# Altium PCB VoiceAssistant-v1.0.PcbDoc (part 3 of 3)
Units mm, origin at the board's own origin, x right, y up, seen from the top; angles counter-clockwise.
Board outline 90 x 90 mm, 2 copper layers (Top Layer, Bottom Layer); 340 components, 253 nets, 950 pads, 0 vias.
Unrouted connection lines stored in the file: 677.
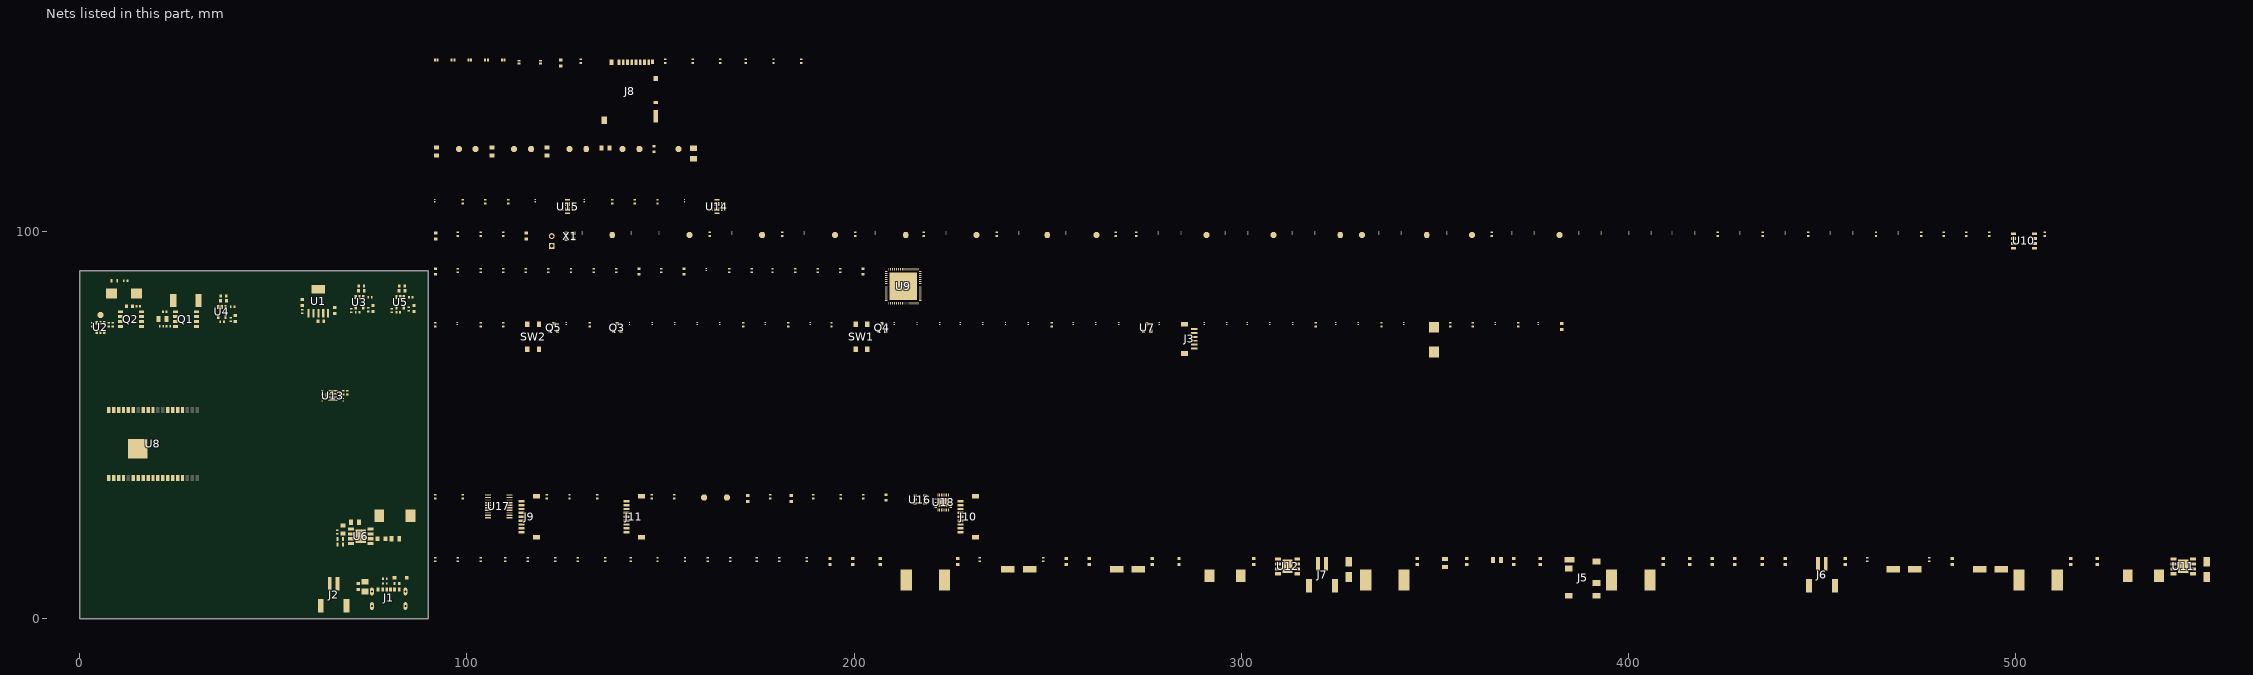
[diagram p2: the nets of this part, all layers, seen from the top]

## Part data (continued)
R22: library part RC0603FR-071ML, "RES SMD 1M OHM 1% 1/10W 0603", Case Code (Imperial)=0603, Case Code (Metric)=1608, LCSC Part Number=C105578, Manufacturer=Yageo, Max Operating Temperature=155°C, Min Operating Temperature=-55°C, Package Quantity=5000, Power Rating=100mW, Resistance=1MR, Supplier Part Number 1=311-1.00MHRDKR-ND, Temperature Coefficient=100ppm/°C, Tolerance=1%, Voltage Rating=50V, Case/Package=0603, ComponentLink1Description=http://www.farnell.com/datasheets/2167052.pdf?src-supplier=Mouser, ComponentLink1URL=http://www.farnell.com/datasheets/2167052.pdf?src-supplier=Mouser, ComponentLink2Description=http://www.farnell.com/datasheets/2167052.pdf?src-supplier=Element14, ComponentLink2URL=http://www.farnell.com/datasheets/2167052.pdf?src-supplier=Element14, ComponentLink3Description=http://documents.rs-components.com/techlib://itc_doclist_GB.htm?stockno=5048956&src-supplier=RSComponents, ComponentLink3URL=http://documents.rs-components.com/techlib://itc_doclist_GB.htm?stockno=5048956&src-supplier=RSComponents, Composition="Thick Film", Depth=0.8mm, Height=0.45mm, Item Type=Resistor, Lead Free="Lead Free", Length=1.6mm, Manufacturer Part Number=RC0603FR-071ML, Military Standard=Not, Number of Pins=2, Packaging="Tape and Reel", Pricing 1="1=0.1, 10=0.023, 100=0.0094, 1000=0.00421, 2500=0.00366 (USD)", REACH SVHC="No SVHC", Stock 1=3824601, Supplier 1=Digi-Key, Termination=SMD/SMT, Voltage Rating (DC)=50V, Width=0.8mm
R24: library part RT0805BRD07316RL, "RES SMD 316 OHM 0.1% 1/8W 0805", Case Code (Imperial)=0805, Case Code (Metric)=2012, LCSC Part Number=C723489, Manufacturer=Yageo, Max Operating Temperature=155°C, Max Power Dissipation=125mW, Min Operating Temperature=-55°C, Supplier Part Number=RT0805BRD07316RL-ND, Temperature Coefficient=25ppm/°C, Tolerance=0.1%, Voltage Rating=150V, Case/Package=0805, Category="Chip SMD Resistors", ComponentLink1Description=https://datasheet.ciiva.com/2584/pyu-rt-1-to-0-05-rohs-l-5-2584943.pdf?src-supplier=Digi-Key, ComponentLink1URL=https://datasheet.ciiva.com/2584/pyu-rt-1-to-0-05-rohs-l-5-2584943.pdf?src-supplier=Digi-Key, Height=0.5mm, Item Type=Resistor, Lead Free="Lead Free", Length=2mm, Manufacturer Part Number=RT0805BRD07316RL, Number of Terminations=2, Packaging="Tape and Reel", Power Rating=125mW, Pricing="5000=0.04319 (USD)", RoHS=Yes, RoHS Compliant=Yes, Series=RT, Supplier=Digi-Key, Termination=SMD/SMT, Voltage Rating (DC)=150V, Weight=0.000194oz, Width=1.2mm
R25: library part RC0805FR-071KL, "RES 1K OHM 1% 1/8W 0805", Case Code (Imperial)=0805, Case Code (Metric)=2012, LCSC Part Number=C95781, Manufacturer=Yageo, Max Operating Temperature=155°C, Max Power Dissipation=125mW, Min Operating Temperature=-55°C, Package Quantity=1, Resistance Tolerance=1%, Resistor Type="Thick Film", Supplier Part Number=8126013, Temperature Coefficient=100ppm/°C, Voltage Rating=150V, Case/Package=0805, Category="Chip SMD Resistors", ComponentLink1Description=https://datasheet.ciiva.com/7941/1686128-7941719.pdf?src-supplier=Element14, ComponentLink1URL=https://datasheet.ciiva.com/7941/1686128-7941719.pdf?src-supplier=Element14, ComponentLink2Description=https://datasheet.ciiva.com/46385/444164-46385020.pdf?src-supplier=Element14, ComponentLink2URL=https://datasheet.ciiva.com/46385/444164-46385020.pdf?src-supplier=Element14, ComponentLink3Description=https://datasheet.ciiva.com/2456/pyu-r-int-thick-7-2456976.pdf?src-supplier=Digi-Key, ComponentLink3URL=https://datasheet.ciiva.com/2456/pyu-r-int-thick-7-2456976.pdf?src-supplier=Digi-Key, ComponentLink4Description=https://datasheet.ciiva.com/2456/pyu-r-int-thick-7-2456977.pdf?src-supplier=Digi-Key, ComponentLink4URL=https://datasheet.ciiva.com/2456/pyu-r-int-thick-7-2456977.pdf?src-supplier=Digi-Key, ComponentLink5Description=https://datasheet.ciiva.com/2456/pyu-r-int-thick-7-2456975.pdf?src-supplier=Digi-Key, ComponentLink5URL=https://datasheet.ciiva.com/2456/pyu-r-int-thick-7-2456975.pdf?src-supplier=Digi-Key, ComponentLink6Description=https://datasheet.ciiva.com/16850/rc0805-16850409.pdf?src-supplier=Future+Electronics, ComponentLink6URL=https://datasheet.ciiva.com/16850/rc0805-16850409.pdf?src-supplier=Future+Electronics, Construction=Rectangular, Depth=1.25mm, Features="Moisture Resistant", Height=0.024inch, Item Type=Resistor, Lead Free=5697LeadFree, Length=0.079inch, Manufacturer Part Number=RC0805FR-071KL, Military Standard=Not, Number of Terminations=2, Packaging="Tape and Reel", Pins=2, Power Rating=125mW, Pricing="5000=0.117, 25000=0.112, 125000=0.107, 500000=0.104, 1250000=0.0981 (USD)", Reach SVHC Compliant=No, RoHS=Yes, RoHS Compliant=Yes, Series=RC, Stock=8305000, Supplier="Future Electronics", Termination=SMD/SMT, Tolerance=1%, Voltage Rating (AC)=150V, Voltage Rating (DC)=150V, Width=0.049inch
R30 R32 R33 R34 R37 R41 R42 R43 R44 R45 R46 R47 R48 R49 R50 R51 R52 R53 R54 R55 R56 R57 R58 R59 R60 R61 R62 R63 R64 R65 R67: library part RC0201JR-070RL, "RES SMD 0 OHM JUMPER 1/20W 0201", Case Code (Imperial)=0201, Case Code (Metric)=0603, LCSC Part Number=C106228, Manufacturer=Yageo, Max Operating Temperature=125°C, Max Power Dissipation=50mW, Min Operating Temperature=-55°C, Package Quantity=10000, Resistance Tolerance=5%, Resistor Type="Thick Film", Supplier Part Number 1=311-0.0NCT-ND, Voltage Rating=25V, Case/Package=0201, Category="Chip SMD Resistors", ComponentLink1Description=https://datasheet.ciiva.com/7672/1563626-7672247.pdf?src-supplier=Element14, ComponentLink1URL=https://datasheet.ciiva.com/7672/1563626-7672247.pdf?src-supplier=Element14, ComponentLink2Description=https://datasheet.ciiva.com/7660/1421516-7660808.pdf?src-supplier=Element14, ComponentLink2URL=https://datasheet.ciiva.com/7660/1421516-7660808.pdf?src-supplier=Element14, ComponentLink3Description=https://datasheet.ciiva.com/7672/1563626-7672248.pdf?src-supplier=Element14, ComponentLink3URL=https://datasheet.ciiva.com/7672/1563626-7672248.pdf?src-supplier=Element14, ComponentLink4Description=https://datasheet.ciiva.com/16855/pyu-rc0201-51-rohs-l-8-16855994.pdf?src-supplier=Avnet+Europe, ComponentLink4URL=https://datasheet.ciiva.com/16855/pyu-rc0201-51-rohs-l-8-16855994.pdf?src-supplier=Avnet+Europe, ComponentLink5Description=https://datasheet.ciiva.com/28419/pyu-rc0201-51-rohs-l-8-28419660.pdf?src-supplier=Avnet+Europe, ComponentLink5URL=https://datasheet.ciiva.com/28419/pyu-rc0201-51-rohs-l-8-28419660.pdf?src-supplier=Avnet+Europe, ComponentLink6Description=https://datasheet.ciiva.com/46391/1421516-46391340.pdf?src-supplier=Element14, ComponentLink6URL=https://datasheet.ciiva.com/46391/1421516-46391340.pdf?src-supplier=Element14, ComponentLink7Description=https://datasheet.ciiva.com/8896/pyu-rc0201-51-rohs-l-8-8896143.pdf?src-supplier=Avnet, ComponentLink7URL=https://datasheet.ciiva.com/8896/pyu-rc0201-51-rohs-l-8-8896143.pdf?src-supplier=Avnet, Construction=Rectangular, Contact Plating=Tin,Matte, Depth=0.3mm, Features="Moisture Resistant", Height=0.01inch, Lead Free="Lead Free", Length=0.6mm, Manufacturer Part Number=RC0201JR-070RL, Military Standard=Not, Number of Terminations=2, Packaging="Tape and Reel", Power Rating=50mW, Pricing 1="1=0.10000, 10=0.03600, 25=0.02640, 50=0.02000, 100=0.01480, 250=0.01128, 500=0.00904, 1000=0.00665, 5000=0.00477 (USD)", Radiation Hardening=No, REACH SVHC=Unknown, Resistance=0R, RoHS=Yes, RoHS Compliant=Yes, Series=RC, Size Code=0201, Stock 1=11079, Supplier 1=Digi-Key, Termination=SMD/SMT, Tolerance=5%, Voltage Rating (DC)=25V, Weight=6E-06oz, Width=0.012inch
R35 R112 R113 R114 R116: library part RC0603JR-070RL, "RES 0 OHM JUMPER 1/10W 0603", Case Code (Imperial)=0603, Case Code (Metric)=1608, LCSC Part Number=C95177, Manufacturer=Yageo, Max Operating Temperature=155°C, Max Power Dissipation=100mW, Min Operating Temperature=-55°C, Package Quantity=5000, Resistance=0mR, Resistance Tolerance=5%, Resistor Type="Thick Film", Supplier Part Number 1=311-0.0GRCT-ND, Temperature Coefficient=200ppm/°C, Tolerance=1%, Voltage Rating=50V, Case/Package=0603, Category="Chip SMD Resistors", Construction=Rectangular, Contact Plating=Tin,Matte, Depth=0.8mm, Features="Moisture Resistant", Height=0.45mm, Item Type=Resistor, Lead Free="Lead Free", Length=1.6mm, Manufacturer Part Number=RC0603JR-070RL, Military Standard=Not, Number of Pins=2, Number of Terminations=2, Packaging="Tape and Reel", Power Rating=100mW, Pricing 1="1=0.10000, 10=0.01700, 25=0.01240, 50=0.00960, 100=0.00700, 250=0.00536, 500=0.00430, 1000=0.00316 (USD)", Radiation Hardening=No, Reach SVHC Compliant="No SVHC", RoHS=Yes, RoHS Compliant=Yes, Series=RC, Size Code=0603, Stock 1=18081776, Supplier 1=Digi-Key, Technology="THICK FILM", Termination=SMD/SMT, Voltage Rating (DC)=50V, Width=0.8mm
R75 R76 R77 R78 R79 R80 R81 R82 R83 R84 R85 R86 R87 R88 R93 R94 R95 R96 R97 R98 R99 R100 R101 R102 R103 R104 R105 R106 R107 R108 R136 R138 R140 R141 R142 R143: library part RC0201FR-0733RL, "RES 33 OHM 1% 1/20W 0201", LCSC Part Number=C295794, Manufacturer=Yageo, Supplier Part Number=6199285, Category="Chip SMD Resistors", ComponentLink1Description=https://datasheet.ciiva.com/2560/pyu-r-int-thick-7-2560877.pdf?src-supplier=Digi-Key, ComponentLink1URL=https://datasheet.ciiva.com/2560/pyu-r-int-thick-7-2560877.pdf?src-supplier=Digi-Key, ComponentLink2Description=https://datasheet.ciiva.com/2560/pyu-r-int-thick-7-2560878.pdf?src-supplier=Digi-Key, ComponentLink2URL=https://datasheet.ciiva.com/2560/pyu-r-int-thick-7-2560878.pdf?src-supplier=Digi-Key, ComponentLink3Description=https://datasheet.ciiva.com/2560/pyu-r-int-thick-7-2560879.pdf?src-supplier=Digi-Key, ComponentLink3URL=https://datasheet.ciiva.com/2560/pyu-r-int-thick-7-2560879.pdf?src-supplier=Digi-Key, ComponentLink4Description=https://datasheet.ciiva.com/7672/1563626-7672223.pdf?src-supplier=Element14, ComponentLink4URL=https://datasheet.ciiva.com/7672/1563626-7672223.pdf?src-supplier=Element14, ComponentLink5Description=https://datasheet.ciiva.com/22698/1563626-22698520.pdf?src-supplier=Element14, ComponentLink5URL=https://datasheet.ciiva.com/22698/1563626-22698520.pdf?src-supplier=Element14, Item Type=Resistor, Manufacturer Part Number=RC0201FR-0733RL, Pricing="10000=0.0013, 50000=0.0012, 250000=0.0012, 750000=0.0011, 2000000=0.001 (USD)", RoHS=Yes, Stock=1420000, Supplier="Future Electronics"
R109: library part RC0201FR-073K3L, "RES 3.3K OHM 1% 1/20W 0201", LCSC Part Number=C274874, Manufacturer=Yageo, Supplier Part Number=1068525, Category="Chip SMD Resistors", ComponentLink1Description=https://datasheet.ciiva.com/14985/pyu-r-int-thick-7-14985418.pdf?src-supplier=Digi-Key, ComponentLink1URL=https://datasheet.ciiva.com/14985/pyu-r-int-thick-7-14985418.pdf?src-supplier=Digi-Key, ComponentLink2Description=https://datasheet.ciiva.com/22698/1563626-22698524.pdf?src-supplier=Element14, ComponentLink2URL=https://datasheet.ciiva.com/22698/1563626-22698524.pdf?src-supplier=Element14, Item Type=Resistor, Manufacturer Part Number=RC0201FR-073K3L, Pricing="10000=0.0009, 50000=0.0013, 100000=0.0008, 250000=0.0013, 400000=0.0008, 750000=0.0012, 1500000=0.0007, 2000000=0.0011, 5000000=0.0007 (USD)", RoHS=Yes, Stock=40000, Supplier="Future Electronics"
R110 R111: library part RC0402FR-0756KL, "RES 56K OHM 1% 1/16W 0402", Case Code (Imperial)=0402, Case Code (Metric)=1005, LCSC Part Number=C114756, Manufacturer=Yageo, Max Operating Temperature=155°C, Max Power Dissipation=63mW, Min Operating Temperature=-55°C, Package Quantity=1, Power Rating=62.5mW, Resistance Tolerance=1%, Resistor Type="Thick Film", Supplier Part Number 1=3873767, Temperature Coefficient=100ppm/°C, Voltage Rating=50V, Case/Package=0402, Category="Chip SMD Resistors", ComponentLink1Description=https://datasheet.ciiva.com/46412/1018594-46412840.pdf?src-supplier=Element14, ComponentLink1URL=https://datasheet.ciiva.com/46412/1018594-46412840.pdf?src-supplier=Element14, ComponentLink2Description=https://datasheet.ciiva.com/2453/pyu-r-int-thick-7-2453479.pdf?src-supplier=Digi-Key, ComponentLink2URL=https://datasheet.ciiva.com/2453/pyu-r-int-thick-7-2453479.pdf?src-supplier=Digi-Key, ComponentLink3Description=https://datasheet.ciiva.com/2453/pyu-r-int-thick-7-2453480.pdf?src-supplier=Digi-Key, ComponentLink3URL=https://datasheet.ciiva.com/2453/pyu-r-int-thick-7-2453480.pdf?src-supplier=Digi-Key, ComponentLink4Description=https://datasheet.ciiva.com/2453/pyu-r-int-thick-7-2453478.pdf?src-supplier=Digi-Key, ComponentLink4URL=https://datasheet.ciiva.com/2453/pyu-r-int-thick-7-2453478.pdf?src-supplier=Digi-Key, ComponentLink5Description=https://datasheet.ciiva.com/5558/pyu-rc0402-51-rohs-l-6-r-5558279.pdf?src-supplier=Mouser, ComponentLink5URL=https://datasheet.ciiva.com/5558/pyu-rc0402-51-rohs-l-6-r-5558279.pdf?src-supplier=Mouser, ComponentLink6Description=https://datasheet.ciiva.com/7850/1018594-7850045.pdf?src-supplier=Element14, ComponentLink6URL=https://datasheet.ciiva.com/7850/1018594-7850045.pdf?src-supplier=Element14, ComponentLink7Description=https://datasheet.ciiva.com/7850/1018594-7850044.pdf?src-supplier=Element14, ComponentLink7URL=https://datasheet.ciiva.com/7850/1018594-7850044.pdf?src-supplier=Element14, Construction=Rectangular, Depth=0.5mm, Features="Moisture Resistant", Height=0.016inch, Item Type=Resistor, Lead Free="Lead Free", Length=0.039inch, Manufacturer Part Number=RC0402FR-0756KL, Military Standard=Not, Number of Terminations=2, Packaging="Tape and Reel", Pricing 1="10000=0.001, 50000=0.001, 300000=0.0009, 1000000=0.0009, 3000000=0.0008 (USD)", Reach SVHC Compliant=No, RoHS=Yes, RoHS Compliant=Yes, Series=RC, Stock 1=2610000, Supplier 1="Future Electronics", Technology="THICK FILM", Termination=SMD/SMT, Tolerance=1%, Width=0.02inch, Working Voltage=50V
R115: library part RC0603FR-0722K1L, "RES 22.1K OHM 1% 1/10W 0603", Case Code (Imperial)=0603, Case Code (Metric)=1608, LCSC Part Number=C137768, Manufacturer=Yageo, Max Operating Temperature=155°C, Min Operating Temperature=-55°C, Package Quantity=5000, Power Rating=100mW, Resistance=22.1kR, Temperature Coefficient=100ppm/°C, Tolerance=1%, Voltage Rating=50V, Case/Package=0603, Category="Chip SMD Resistors", ComponentLink1Description=https://datasheet.ciiva.com/12555/rc0603-272842-12555287.pdf?src-supplier=Mouser, ComponentLink1URL=https://datasheet.ciiva.com/12555/rc0603-272842-12555287.pdf?src-supplier=Mouser, Height=0.45mm, Item Type=Resistor, Lead Free="Lead Free", Length=1.6mm, Manufacturer Part Number=RC0603FR-0722K1L, Packaging="Tape and Reel", Pricing 1="5000=0.00133, 10000=0.00131, 20000=0.00127 (USD)", RoHS=Yes, RoHS Compliant=Yes, Series=RC, Size Code=0603, Stock 1=595000, Supplier 1=Avnet, Supplier Part Number 1=RC0603FR-0722K1L, Termination=SMD/SMT, Voltage Rating (DC)=50V, Width=0.8mm
R118 R119: library part RC0603FR-071RL, "RES 1 OHM 1% 1/10W 0603", Case Code (Imperial)=0603, Case Code (Metric)=1608, LCSC Part Number=C112305, Manufacturer=Yageo, Max Operating Temperature=155°C, Max Power Dissipation=100mW, Min Operating Temperature=-55°C, Package Quantity=1, Resistance Tolerance=1%, Resistor Type="Thick Film", Supplier Part Number=5226550, Temperature Coefficient=200ppm/°C, Voltage Rating=50V, Case/Package=0603, Category="Chip SMD Resistors", ComponentLink1Description=https://datasheet.ciiva.com/11808/0900766b80f96399-11808162.pdf?src-supplier=Rs, ComponentLink1URL=https://datasheet.ciiva.com/11808/0900766b80f96399-11808162.pdf?src-supplier=Rs, ComponentLink2Description=https://datasheet.ciiva.com/6547/pyu-r-int-thick-7-6547270.pdf?src-supplier=Digi-Key, ComponentLink2URL=https://datasheet.ciiva.com/6547/pyu-r-int-thick-7-6547270.pdf?src-supplier=Digi-Key, ComponentLink3Description=https://datasheet.ciiva.com/6547/pyu-r-int-thick-7-6547271.pdf?src-supplier=Digi-Key, ComponentLink3URL=https://datasheet.ciiva.com/6547/pyu-r-int-thick-7-6547271.pdf?src-supplier=Digi-Key, ComponentLink4Description=https://datasheet.ciiva.com/6547/pyu-r-int-thick-7-6547269.pdf?src-supplier=Digi-Key, ComponentLink4URL=https://datasheet.ciiva.com/6547/pyu-r-int-thick-7-6547269.pdf?src-supplier=Digi-Key, ComponentLink5Description=https://datasheet.ciiva.com/7746/1738695-7746296.pdf?src-supplier=Element14, ComponentLink5URL=https://datasheet.ciiva.com/7746/1738695-7746296.pdf?src-supplier=Element14, ComponentLink6Description=https://datasheet.ciiva.com/7746/1738695-7746297.pdf?src-supplier=Element14, ComponentLink6URL=https://datasheet.ciiva.com/7746/1738695-7746297.pdf?src-supplier=Element14, Depth=0.8mm, Features="Moisture Resistant", Height=0.022inch, Item Type=Resistor, Lead Free="Lead Free", Length=0.063inch, Manufacturer Part Number=RC0603FR-071RL, Number of Terminations=2, Packaging="Tape and Reel", Pins=2, Power Rating=100mW, Pricing="5000=0.0023, 25000=0.0022, 125000=0.0021, 500000=0.002, 1250000=0.0018 (USD)", Reach SVHC Compliant=Unknown, RoHS=Yes, RoHS Compliant=Yes, Series=RC, Stock=4635000, Supplier="Future Electronics", Technology="THICK FILM", Termination=SMD/SMT, Tolerance=1%, Voltage Rating (DC)=50V, Width=0.031inch
R120: library part RT0402BRD0718KL, "RES SMD 18K OHM 0.1% 1/16W 0402", Case Code (Imperial)=0402, Case Code (Metric)=1005, LCSC Part Number=C852579, Manufacturer=Yageo, Max Operating Temperature=155°C, Max Power Dissipation=63mW, Min Operating Temperature=-55°C, Package Quantity=10000, Power Rating=62.5mW, Supplier Part Number=4031418, Temperature Coefficient=25ppm/°C, Tolerance=0.1%, Voltage Rating=50V, Case/Package=0402, Category="Chip SMD Resistors", ComponentLink1Description=https://datasheet.ciiva.com/12798/pyu-rt-1-to-0-05-rohs-l-4-12798951.pdf?src-supplier=Mouser, ComponentLink1URL=https://datasheet.ciiva.com/12798/pyu-rt-1-to-0-05-rohs-l-4-12798951.pdf?src-supplier=Mouser, ComponentLink2Description=https://datasheet.ciiva.com/2582/pyu-rt-1-to-0-05-rohs-l-5-2582178.pdf?src-supplier=Digi-Key, ComponentLink2URL=https://datasheet.ciiva.com/2582/pyu-rt-1-to-0-05-rohs-l-5-2582178.pdf?src-supplier=Digi-Key, Height=0.014inch, Item Type=Resistor, Lead Free="Lead Free", Length=0.039inch, Manufacturer Part Number=RT0402BRD0718KL, Number of Terminations=2, Packaging="Tape and Reel", Pricing="10000=0.02, 20000=0.0196, 40000=0.0191, 50000=0.019, 150000=0.0181 (USD)", RoHS=Yes, RoHS Compliant=Yes, Series=RT, Stock=120000, Supplier="Future Electronics", Termination=SMD/SMT, Voltage Rating (DC)=50V, Weight=2.3E-05oz, Width=0.5mm
R121: library part RT0402BRD0728KL, "RES SMD 28K OHM 0.1% 1/16W 0402", LCSC Part Number=C852686, Manufacturer=Yageo, Supplier Part Number=YAG4224CT-ND, Category="Chip SMD Resistors", ComponentLink1Description=https://datasheet.ciiva.com/2582/pyu-rt-1-to-0-05-rohs-l-5-2582274.pdf?src-supplier=Digi-Key, ComponentLink1URL=https://datasheet.ciiva.com/2582/pyu-rt-1-to-0-05-rohs-l-5-2582274.pdf?src-supplier=Digi-Key, Item Type=Resistor, Manufacturer Part Number=RT0402BRD0728KL, Pricing="1=0.38, 10=0.307, 50=0.1704, 100=0.1198, 500=0.07636, 1000=0.05287, 5000=0.04406 (USD)", RoHS=Yes, Stock=21647, Supplier=Digi-Key
R122 R124: library part RT0603BRD07510KL, "RES SMD 510K OHM 0.1% 1/10W 0603", LCSC Part Number=C861452, Manufacturer=Yageo, Supplier Part Number=13-RT0603BRD07510KLCT-ND, Category="Chip SMD Resistors", ComponentLink1Description=https://datasheet.ciiva.com/12810/pyu-rt-1-to-0-05-rohs-l-4-12810533.pdf?src-supplier=Mouser, ComponentLink1URL=https://datasheet.ciiva.com/12810/pyu-rt-1-to-0-05-rohs-l-4-12810533.pdf?src-supplier=Mouser, Item Type=Resistor, Manufacturer Part Number=RT0603BRD07510KL, Pricing="1=0.3, 10=0.243, 50=0.135, 100=0.095, 500=0.06052, 1000=0.0419 (USD)", RoHS=Yes, Stock=20520, Supplier=Digi-Key
R123 R125: library part RT0603BRE07110KL, "RES SMD 110K OHM 0.1% 1/10W 0603", LCSC Part Number=C861631, Manufacturer=Yageo, Supplier Part Number=603-RT0603BRE07110KL, Category="Chip SMD Resistors", ComponentLink1Description=https://datasheet.ciiva.com/2584/pyu-rt-1-to-0-05-rohs-l-5-2584174.pdf?src-supplier=Digi-Key, ComponentLink1URL=https://datasheet.ciiva.com/2584/pyu-rt-1-to-0-05-rohs-l-5-2584174.pdf?src-supplier=Digi-Key, Item Type=Resistor, Manufacturer Part Number=RT0603BRE07110KL, Pricing="1=0.42, 10=0.191, 50=0.191, 100=0.096, 1000=0.061, 10000=0.038 (USD)", RoHS=Yes, Stock=12188, Supplier=Mouser
R126 R127: library part RC0402FR-0730KL, "RES 30K OHM 1% 1/16W 0402", Case Code (Imperial)=0402, Case Code (Metric)=1005, Manufacturer=Yageo, Max Operating Temperature=155°C, Max Power Dissipation=63mW, Min Operating Temperature=-55°C, Power Rating=62.5mW, Resistance=30kR, Resistance Tolerance=1%, Resistor Type="Thick Film", Supplier Part Number 1=603-RC0402FR-0730KL, Temperature Coefficient=100ppm/°C, Voltage Rating=50V, Case/Package=0402, Category="Chip SMD Resistors", ComponentLink1Description=https://datasheet.ciiva.com/7849/1018594-7849957.pdf?src-supplier=Element14, ComponentLink1URL=https://datasheet.ciiva.com/7849/1018594-7849957.pdf?src-supplier=Element14, ComponentLink2Description=https://datasheet.ciiva.com/46394/1018594-46394938.pdf?src-supplier=Element14, ComponentLink2URL=https://datasheet.ciiva.com/46394/1018594-46394938.pdf?src-supplier=Element14, ComponentLink3Description=https://datasheet.ciiva.com/12577/pyu-rc0402-51-rohs-l-6-r-12577743.pdf?src-supplier=Mouser, ComponentLink3URL=https://datasheet.ciiva.com/12577/pyu-rc0402-51-rohs-l-6-r-12577743.pdf?src-supplier=Mouser, Construction=Rectangular, Depth=0.5mm, Features="Moisture Resistant", Height=0.35mm, Lead Free="Lead Free", Length=1mm, Manufacturer Part Number=RC0402FR-0730KL, Military Standard=Not, Number of Terminations=2, Packaging="Tape and Reel", Pricing 1="1=0.10000, 10=0.01200, 50=0.01200, 100=0.00500, 1000=0.00300, 2500=0.00200, 10000=0.00100 (USD)", REACH SVHC=Unknown, RoHS=Yes, RoHS Compliant=Yes, Series=RC, Size Code=0402, Stock 1=684954, Supplier 1=Mouser, Termination=SMD/SMT, Tolerance=1%, Voltage Rating (DC)=50V, Weight=2.3E-05oz, Width=0.5mm
SB1: "Solder Bridge ON", Item Type="Solder Bridge", Manufacturer Part Number="Solder Bridge 0402"
SW1 SW2: "No NO 50mA 4.5mm 100000 260gf 12V -30℃~+85℃ 4.5mm 4.3mm Black Round Button Brick nogging SPST SMD Tactile Switches ROHS", LCSC Part Number=C381037, Manufacturer="XKB Connectivity", Package=Custom, ComponentLink1Description=LCSC, ComponentLink1URL=https://www.lcsc.com/product-detail/Tactile-Switches_XKB-Connectivity-TS-1109S-C-B_C381037.html, Item Type=Switch, Manufacturer Part Number=TS-1109S-C-B
U1: "IC REG LINEAR 3.3V 1A SOT223-6", LCSC Part Number=C485803, Manufacturer="Texas Instruments", Supplier Part Number=595-TPS79633DCQR, Category="Voltage Regulators - Linear", ComponentLink1Description=https://datasheet.ciiva.com/2045/tps79601-2045264.pdf?src-supplier=Digi-Key, ComponentLink1URL=https://datasheet.ciiva.com/2045/tps79601-2045264.pdf?src-supplier=Digi-Key, ComponentLink2Description=https://datasheet.ciiva.com/22704/1846966-22704703.pdf?src-supplier=Element14, ComponentLink2URL=https://datasheet.ciiva.com/22704/1846966-22704703.pdf?src-supplier=Element14, ComponentLink3Description=https://datasheet.ciiva.com/41462/001015136-da-01-en-ic-reg-ldo-3-3v-1-tps79633dcqr-sot-6-tid-41462982.pdf?src-supplier=Conrad, ComponentLink3URL=https://datasheet.ciiva.com/41462/001015136-da-01-en-ic-reg-ldo-3-3v-1-tps79633dcqr-sot-6-tid-41462982.pdf?src-supplier=Conrad, Item Type=IC, Length=6.5mm, Manufacturer Part Number=TPS79633DCQR, Pricing="1=3.24, 10=2.75, 50=2.75, 100=2.39, 1000=1.72, 10000=1.56 (USD)", RoHS=Yes, Stock=3089, Supplier=Mouser, Thickness=1.6mm, Width=3.5mm
U2: "IC CNTRLR ON/OFF W/DEB TSOT23-6", Case/Package=SOT-23-6, LCSC Part Number=C79401, Manufacturer=Maxim, Max Operating Temperature=125°C, Max Power Dissipation=727W, Max Supply Voltage=5.5V, Min Operating Temperature=-40°C, Min Supply Voltage=2.7V, Number of Voltages Monitored=1, Operating Supply Current=7uA, Undervoltage Threshold=1.8V, Category="Interface ICs", ComponentLink1Description=https://datasheet.ciiva.com/4901/max16054-83881-4901086.pdf?src-supplier=Mouser, ComponentLink1URL=https://datasheet.ciiva.com/4901/max16054-83881-4901086.pdf?src-supplier=Mouser, ComponentLink2Description=https://datasheet.ciiva.com/1784/max16054-1784560.pdf?src-supplier=Digi-Key, ComponentLink2URL=https://datasheet.ciiva.com/1784/max16054-1784560.pdf?src-supplier=Digi-Key, ComponentLink3Description=https://datasheet.ciiva.com/14247/max16054-14247770.pdf?src-supplier=Avnet, ComponentLink3URL=https://datasheet.ciiva.com/14247/max16054-14247770.pdf?src-supplier=Avnet, ComponentLink4Description=https://datasheet.ciiva.com/1784/max16054-1784561.pdf?src-supplier=Digi-Key, ComponentLink4URL=https://datasheet.ciiva.com/1784/max16054-1784561.pdf?src-supplier=Digi-Key, ComponentLink5Description=https://datasheet.ciiva.com/1784/max16054-1784562.pdf?src-supplier=Digi-Key, ComponentLink5URL=https://datasheet.ciiva.com/1784/max16054-1784562.pdf?src-supplier=Digi-Key, Contact Plating=Tin,Matte, Height=0.73mm, Item Type=IC, Length=4mm, Manufacturer Part Number=MAX16054AZT+T, Mounting Technology="Surface Mount", Output Type=PUSH-PULL, Package Quantity=1, Packaging="Tape and Reel", Pins=6, Pricing 1="1=2.99700 (USD)", Radiation Hardening=No, RoHS=Yes, RoHS Compliant=Yes, Series=-, Stock 1=3, Supplier 1="Arrow Electronics", Supplier Part Number 1=MAX16054AZT+T, Watchdog Timer=No, Width=4mm
U3 U4 U5 U16: "IC REG LIN POS ADJ 400MA SOT23-5", LCSC Part Number=C59200, Manufacturer="Texas Instruments", Supplier Part Number=595-TPS73601DBVR, Category="Voltage Regulators - Linear", ComponentLink1Description=https://datasheet.ciiva.com/22700/1831172-22700145.pdf?src-supplier=Element14, ComponentLink1URL=https://datasheet.ciiva.com/22700/1831172-22700145.pdf?src-supplier=Element14, ComponentLink2Description=https://datasheet.ciiva.com/41462/001015018-da-01-en-ic-reg-ldo-adj-0-tps73601dbvr-sot-5-tid-41462863.pdf?src-supplier=Conrad, ComponentLink2URL=https://datasheet.ciiva.com/41462/001015018-da-01-en-ic-reg-ldo-adj-0-tps73601dbvr-sot-5-tid-41462863.pdf?src-supplier=Conrad, Item Type=IC, Manufacturer Part Number=TPS73601DBVR, Pricing="1=1.44, 10=1.25, 50=1.25, 100=0.966, 1000=0.655, 10000=0.621 (USD)", RoHS=Yes, Stock=2988, Supplier=Mouser
U6: "4V~6V Polymer 1 3.5A SOP-8-EP Battery Management ICs ROHS", LCSC Part Number=C130316, Manufacturer=SOLA-IC, Package=SOP-8-EP, ComponentLink1Description=LCSC, ComponentLink1URL=https://www.lcsc.com/product-detail/Battery-Management-ICs_SOLA-IC-SLM6600_C130316.html, Item Type=IC, Manufacturer Part Number=SLM6600
U7: "IC SUPERVISOR 1 CHANNEL SOT23-3", Case/Package=SOT-23, LCSC Part Number=C43445, Manufacturer="ON Semiconductor", Max Operating Temperature=85°C, Max Power Dissipation=320mW, Max Reset Threshold Voltage=2.66V, Max Supply Voltage=5.5V, Min Operating Temperature=-40°C, Min Reset Threshold Voltage=2.59V, Min Supply Voltage=1.2V, Number of Voltages Monitored=1, Operating Supply Current=15uA, Threshold Voltage=2.63V, Category="Voltage Supervisors", ComponentLink1Description=https://datasheet.ciiva.com/15106/getdatasheetpartid-292712-15106066.pdf?src-supplier=Verical, ComponentLink1URL=https://datasheet.ciiva.com/15106/getdatasheetpartid-292712-15106066.pdf?src-supplier=Verical, ComponentLink2Description=https://datasheet.ciiva.com/4902/cat809-d-221891-4902492.pdf?src-supplier=Mouser, ComponentLink2URL=https://datasheet.ciiva.com/4902/cat809-d-221891-4902492.pdf?src-supplier=Mouser, ComponentLink3Description=https://datasheet.ciiva.com/8138/cat803-d-8138454.pdf?src-supplier=Avnet, ComponentLink3URL=https://datasheet.ciiva.com/8138/cat803-d-8138454.pdf?src-supplier=Avnet, ComponentLink4Description=https://datasheet.ciiva.com/16428/cat809-d-16428022.pdf?src-supplier=Future+Electronics, ComponentLink4URL=https://datasheet.ciiva.com/16428/cat809-d-16428022.pdf?src-supplier=Future+Electronics, Halogen Free="Halogen Free", Height=1.12mm, Item Type=IC, Lead Free="Lead Free", Length=3.04mm, Manufacturer Part Number=CAT809RTBI-GT3, Mounting Technology="Surface Mount", Number of Elements=1, Output=TOTEM-POLE, Overvoltage Threshold=2.66V, Package Quantity=1, Packaging="Tape and Reel", Pins=3, Power Dissipation=320mW, Pricing="1751=0.21134, 1800=0.20563, 3600=0.19992, 8800=0.19421, 18000=0.1885, 88000=0.18278, 180000=0.17707 (USD)", Radiation Hardening=No, Reset="Active Low", Reset Timeout=140ms, RoHS=Yes, RoHS Compliant=Yes, Series=-, Stock=9000, Supplier=Avnet, Supplier Part Number=CAT809RTBI-GT3, Supply Current=15uA, Type="Simple Reset/Power-On Reset", Undervoltage Threshold=2.59V, Watchdog Timer=No, Width=1.4mm
U8: "RF TXRX MODULE BT PCB TRACE SMD", LCSC Part Number=C529589, Manufacturer="Espressif Systems", Supplier Part Number=1965-ESP32-WROVER-E-N16R8CT-ND, Category=Uncategorized, Item Type=Module, Manufacturer Part Number=ESP32-WROVER-E-N16R8, Pricing="1=3.28 (USD)", RoHS=No, Stock=11720, Supplier=Digi-Key
U9: "IC AUDIO SIGNAL PROCESSOR 64QFN", LCSC Part Number=C1535597, Manufacturer=Microchip, Supplier Part Number=ZL38063LDG1-ND, Category="Integrated Circuits (ICs)", ComponentLink1Description=https://www.microsemi.com/document-portal/doc_download/136798-zl38063-datasheet?src-supplier=Digi-Key, ComponentLink1URL=https://www.microsemi.com/document-portal/doc_download/136798-zl38063-datasheet?src-supplier=Digi-Key, Item Type=IC, Manufacturer Part Number=ZL38063LDG1, Pricing="1=8.2, 25=7.55, 100=7.175 (USD)", RoHS=Yes, Stock=1300, Supplier=Digi-Key
U10: "IC FLASH 16MBIT SPI/QUAD 8SOIC", Case/Package=SOIC, Frequency=133MHz, LCSC Part Number=C2456211, Manufacturer=Winbond, Max Operating Temperature=85°C, Max Supply Voltage=3.6V, Min Operating Temperature=-40°C, Min Supply Voltage=2.7V, Supplier Part Number=W25Q16JVSNIQ-ND, Access Time-Max=6ns, Category=Flash, ComponentLink1Description=https://datasheet.ciiva.com/56373/w25q16jvspirevg03222018plus-56373878.pdf?src-supplier=Digi-Key, ComponentLink1URL=https://datasheet.ciiva.com/56373/w25q16jvspirevg03222018plus-56373878.pdf?src-supplier=Digi-Key, Interface=SPI,Serial, Item Type=IC, Manufacturer Part Number=W25Q16JVSNIQ, Memory Format=Non-Volatile,FLASH,NOR, Memory Size=16Mb, Mounting Technology="Surface Mount", Packaging=Rail/Tube, Page Size=256B, Pins=8, Pricing="1=0.5, 25=0.4528, 100=0.3969, 500=0.38024, 2500=0.34104 (USD)", RoHS=Yes, RoHS Compliant=Yes, Series=SpiFlash®, Stock=181191, Supplier=Digi-Key
U11 U12: "SOP8L-PP Audio Power OpAmps ROHS", LCSC Part Number=C6705234, Manufacturer="Jiaxing Heroic Elec Tech", Package=SOP8L-PP, ComponentLink1Description=LCSC, ComponentLink1URL=https://www.lcsc.com/product-detail/Audio-Power-OpAmps_Jiaxing-Heroic-Elec-Tech-HT8691RSPER_C6705234.html, Item Type=IC, Manufacturer Part Number=HT8691RSPER
U13 U14 U15: "MIC MEMS DIGITAL PDM OMNI -26DB", LCSC Part Number=C503097, Manufacturer=STMicroelectronics, Operating Supply Current=650uA, Supplier Part Number 1=511-MP34DT06JTR, Voltage Rating=1.8V, Category=Microphones, ComponentLink1Description=http://www.farnell.com/datasheets/2710895.pdf?src-supplier=Farnell, ComponentLink1URL=http://www.farnell.com/datasheets/2710895.pdf?src-supplier=Farnell, ComponentLink2Description=https://www.st.com/resource/en/datasheet/mp34dt06j.pdf?src-supplier=Digi-Key, ComponentLink2URL=https://www.st.com/resource/en/datasheet/mp34dt06j.pdf?src-supplier=Digi-Key, ComponentLink3Description=http://www.farnell.com/datasheets/2710895.pdf?src-supplier=Newark, ComponentLink3URL=http://www.farnell.com/datasheets/2710895.pdf?src-supplier=Newark, ComponentLink4Description=http://www.farnell.com/datasheets/2710895.pdf?src-supplier=Element14, ComponentLink4URL=http://www.farnell.com/datasheets/2710895.pdf?src-supplier=Element14, Direction=Omnidirectional, Item Type=Microphone, Manufacturer Part Number=MP34DT06JTR, Packaging="Cut Tape", Pricing 1="1=2.31, 10=1.92, 50=1.6, 100=1.51, 1000=1.24, 10000=1.23 (USD)", RoHS=Yes, RoHS Compliant=Yes, Series=-, Shape=Rectangular, Stock 1=6064, Supplier 1=Mouser, Termination=Solder
U17: "IC XPNDR 100KHZ I2C 20TSSOP", LCSC Part Number=C94361, Manufacturer="Texas Instruments", Supplier Part Number=595-PCF8574APWR, Category="Interface ICs", ComponentLink1Description=https://datasheet.ciiva.com/23785/1534147-23785504.pdf?src-supplier=Newark, ComponentLink1URL=https://datasheet.ciiva.com/23785/1534147-23785504.pdf?src-supplier=Newark, ComponentLink2Description=https://datasheet.ciiva.com/15134/getdatasheetpartid-253002-15134574.pdf?src-supplier=Verical, ComponentLink2URL=https://datasheet.ciiva.com/15134/getdatasheetpartid-253002-15134574.pdf?src-supplier=Verical, ComponentLink3Description=https://datasheet.ciiva.com/3149/pcf8574a-3149721.pdf?src-supplier=Avnet, ComponentLink3URL=https://datasheet.ciiva.com/3149/pcf8574a-3149721.pdf?src-supplier=Avnet, ComponentLink4Description=https://datasheet.ciiva.com/3149/pcf8574a-3149799.pdf?src-supplier=Avnet, ComponentLink4URL=https://datasheet.ciiva.com/3149/pcf8574a-3149799.pdf?src-supplier=Avnet, ComponentLink5Description=https://datasheet.ciiva.com/7747/1768199-7747660.pdf?src-supplier=Element14, ComponentLink5URL=https://datasheet.ciiva.com/7747/1768199-7747660.pdf?src-supplier=Element14, ComponentLink6Description=https://datasheet.ciiva.com/1780/pcf8574a-1780187.pdf?src-supplier=Digi-Key, ComponentLink6URL=https://datasheet.ciiva.com/1780/pcf8574a-1780187.pdf?src-supplier=Digi-Key, ComponentLink7Description=https://datasheet.ciiva.com/1780/pcf8574a-1780188.pdf?src-supplier=Digi-Key, ComponentLink7URL=https://datasheet.ciiva.com/1780/pcf8574a-1780188.pdf?src-supplier=Digi-Key, ComponentLink8Description=https://datasheet.ciiva.com/1780/pcf8574a-1780189.pdf?src-supplier=Digi-Key, ComponentLink8URL=https://datasheet.ciiva.com/1780/pcf8574a-1780189.pdf?src-supplier=Digi-Key, Item Type=IC, Length=6.5mm, Manufacturer Part Number=PCF8574APWR, Pricing="1=1.54, 10=1.38, 50=1.38, 100=1.07, 1000=0.78, 10000=0.707 (USD)", RoHS=Yes, Stock=4215, Supplier=Mouser, Thickness=1mm, Width=4.4mm
U18: "IC LED DRVR LIN PWM 20MA 28QFN", Case/Package=QFN, LCSC Part Number=C2678726, Manufacturer=ISSI, Max Operating Temperature=105°C, Max Supply Voltage=5.5V, Min Operating Temperature=-40°C, Output Current per Channel=20mA, Supplier Part Number=2521-IS31FL3216A-QFLS3-TRCT-ND, Category="LED Drivers", ComponentLink1Description=http://www.issi.com/WW/pdf/IS31FL3216A.pdf?src-supplier=Digi-Key, ComponentLink1URL=http://www.issi.com/WW/pdf/IS31FL3216A.pdf?src-supplier=Digi-Key, Dimming=PWM, Item Type=IC, Manufacturer Part Number=IS31FL3216A-QFLS3-TR, Mounting Technology="Surface Mount", Number of Outputs=16, Packaging="Cut Tape", Pricing="1=1.5, 10=1.341, 25=1.2728, 100=1.0454, 250=0.97716, 500=0.86356, 1000=0.68175 (USD)", RoHS=Yes, RoHS Compliant=Yes, Series=-, Stock=11431, Supplier=Digi-Key
X1: library part 2TJ412000XYGBC, "12MHz 18pF ±10ppm SMD2520-4P Crystals ROHS", LCSC Part Number=C2149207, Manufacturer=JYJE, Package=SMD2520-4P, ComponentLink1Description=LCSC, ComponentLink1URL=https://www.lcsc.com/product-detail/Crystals_JYJE-2TJ412000XYGBC_C2149207.html, Item Type=Crystal, Manufacturer Part Number=2TJ412000XYGBC

## Nets (pads, with @x,y where several pads share a name; then routed paths per layer and width w, separated by ;. In a path a pad name is that pad's centre, name@x,y a point inside that pad or via, vN(x,y) a via of type N, cw(c..) or ccw(c..) an arc to the next point about the centre after c; other vN are vias at no path point)
AGND: C55.1 C56.1 C79.1 C80.1 J6.MP1 J6.MP2 J7.MP1 J7.MP2 P8.1 R12.1 R116.1
COLUMN1: J9.5 U17.16
COLUMN2: J9.6 U17.17
COLUMN3: J9.7 U17.19
CTRL: R120.2 R121.1 U11.8 U12.8
DCGND: C57.2 C58.2 C59.1 C60.1 C61.1 C62.1 C63.1 C64.1 C65.1 C66.1 C67.1 C68.1 C69.1 C70.1 C71.2 C72.2 C75.1 C76.2 C77.1 C78.2 R13.2 R123.1 R125.1 U11.9 U12.9
DGND: C1.1 C2.1 C6.1 C7.1 C9.1 C11.1 C21.1 C22.2 C23.1 C24.1 C25.1 C81.1 C82.1 C83.1 C84.1 C85.1 C86.1 C87.1 C88.1 C89.1 C91.1 C92.1 C93.2 C94.1 C96.1 D5.1 D6.1 D7.1 D8.1 D9.1 D10.1 D11.1 J8.6 J8.S1 J8.S2 J8.S3 J8.S4 J8.SW-B J9.MP1 J9.MP2 J10.9 J10.MP1 J10.MP2 J11.MP1 J11.MP2 Q3.2 Q4.2 Q5.2 R9.1 R11.1 R13.1 R14.2 R28.1 R38.1 R121.2 R135.2 R139.2 R147.1 R148.1 SW2.3 SW2.4 U1.3 U1.6 U3.2 U8.1 U8.15 U8.38 U8.39 U13.5 U14.5 U15.5 U16.2 U17.6 U17.7 U17.9 U17.15 U18.7 U18.16 U18.25 U18.29
DSP_GND: C12.1 C13.1 C14.1 C15.1 C16.1 C17.1 C26.2 C27.1 C28.1 C29.1 C30.1 C31.1 C32.1 C33.1 C34.1 C35.1 C36.1 C37.1 C38.1 C39.1 C40.2 C41.2 C42.1 C43.1 C44.2 C45.2 C46.2 P9.1 R11.2 R12.2 R19.1 R72.1 R74.1 R89.2 R90.2 R91.2 R92.2 U4.2 U5.2 U9.54 U9.65 U10.4 X1.2 X1.4
EN: C21.2 C24.2 J3.6 R31.1 R37.2 SW2.1 SW2.2 U8.3
ESP_VDD3V3: C22.1 C23.2 R30.1 R31.2 R35.2 U8.2
GND: C3.1 C4.1 C5.1 C8.1 C10.2 C18.1 C19.1 C20.1 C90.1 D1.1 J1.A12 J1.B12 J2.1 J2.MP1 J2.MP2 J3.2 J3.MP1 J3.MP2 LED1.2 P7.1 R1.1 R14.1 R20.1 R21.1 R22.1 R24.1 R36.1 U2.2 U2.3 U6.7 U6.9 U7.1
GPI34: R65.2 U8.6
GPI35: R44.2 U8.7
GPI36: R64.2 U8.4
GPIO0: R50.2 R51.2 U8.25
GPIO2: R60.2 U8.24
GPIO4: R59.2 U8.26
GPIO5: R45.2 U8.29
GPIO12: R55.2 U8.14
GPIO13: R56.2 U8.16
GPIO14: R57.2 U8.13
GPIO15: R58.2 U8.23
GPIO18: R54.2 U8.30
GPIO19: R43.2 U8.31
GPIO21: R62.2 U8.33
GPIO22: R61.2 U8.36
GPIO23: R53.2 U8.37
GPIO25: R46.2 U8.10
GPIO26: R47.2 U8.11
GPIO27: R52.2 U8.12
GPIO32: R48.2 U8.8
GPIO33: R49.2 U8.9
I34_MicroSD_DET: D10.2 J8.SW-A R63.1 R134.1
I35_ZL38063_I2S_SDOA: R44.1 R88.1
I36_Audioout_DET: R64.1 R112.1
I39_Button_Array_INT: R65.1 R145.1 U17.1
IO0: J3.5 R41.2 R50.1
IO0_ZL38063_SPI_HCS: R51.1 R81.1
IO2: D8.2 J8.7 R42.2 R60.1 R132.1
IO4: D9.2 J8.8 R59.1 R133.1
IO5_ZL38063_I2S_SCKA: R45.1 R85.1
IO7-EXP: R63.2 U17.20
IO12: D11.2 J8.1 R55.1
IO13: D5.2 J8.2 R56.1 R129.1
IO14: D7.2 J8.5 R57.1 R131.1
IO15: D6.2 J8.3 R58.1 R130.1
IO18_SDA: R26.1 R54.1 U17.4 U18.24
IO19_ZL38063_RESETN: C41.1 P11.1 R43.1 R71.1 R79.1
IO21_LDO_CTRL: R28.2 R29.2 R62.1
IO22_PA_EN: R61.1 R120.1
IO23_SCL: R27.1 R53.1 U17.2 U18.23
IO25_ZL38063_I2S_WSA: R46.1 R86.1
IO26_ZL38063_I2S_SDIA: R47.1 R87.1
IO27_ZL38063_SPI_HDOUT: R52.1 R83.1
IO32_ZL38063_SPI_HCLK: R48.1 R80.1
IO33_ZL38063_SPI_HDIN: R49.1 R82.1
LDO_SD_VCC3V3: C9.2 C11.2 C81.2 C82.2 J8.4 P5.1 R8.2 R129.2 R130.2 R131.2 R132.2 R133.2 R134.2 U3.5
LED1: J10.1 U18.3
LED2: J10.2 U18.4
LED3: J10.3 U18.5
LED4: J10.4 U18.6
LED5: J10.5 U18.8
LED6: J10.6 U18.9
LED7: J10.7 U18.10
LED8: J10.8 U18.11
LED9: J11.1 U18.12
LED10: J11.2 U18.13
LED11: J11.3 U18.14
LED12: J11.4 U18.15
LED13: J11.5 U18.17
LED14: J11.6 U18.18
LED15: J11.7 U18.19
LED16: J11.8 U18.20
LED-3V3: C91.2 C92.2 C93.1 C94.2 J11.9 R146.2 U16.5 U18.26
LED_LDO_EN: R32.2 R144.1 U16.3
MicroSD_LDO_EN: R6.1 R34.2 U3.3
NetC2_2: C2.2 U1.5
NetC7_2: C7.2 FB1.2 R6.2 U3.1
NetC12_2: C12.2 FB4.2 R15.2 U4.1
NetC13_2: C13.2 FB5.2 R16.2 U5.1
NetC18_2: C18.2 J1.MH1 J1.MH2 J1.MH3 J1.MH4 R22.2
NetC25_2: C25.2 R38.2 R39.2 R40.2 SW1.3 SW1.4
NetC26_1: C26.1 FB6.2 U9.28
NetC27_2: C27.2 C28.2 C30.2 C32.2 C34.2 C36.2 FB7.2 U9.5 U9.21 U9.35 U9.46 U9.51 U9.59
NetC29_2: C29.2 C31.2 C33.2 C35.2 C37.2 FB9.2 U9.4 U9.14 U9.24 U9.42 U9.58
NetC38_2: C38.2 FB8.2 U9.10
NetC39_2: C39.2 U9.11
NetC42_2: C42.2 U9.22 X1.1
NetC43_2: C43.2 U9.23 X1.3
NetC44_1: C44.1 U9.12
NetC45_1: C45.1 C46.1 U9.13
NetC47_2: C47.2 U9.7
NetC48_2: C48.2 U9.6
NetC49_2: C49.2 U9.8
NetC50_2: C50.2 U9.9
NetC51_1: C51.1 R113.1
NetC52_1: C52.1 R114.1
NetC53_1: C53.1 R110.2
NetC54_1: C54.1 R111.2
NetC63_2: C63.2 R118.1
NetC64_2: C64.2 R119.1
NetC65_2: C65.2 R122.1 R123.2 U11.1
NetC66_2: C66.2 R124.1 R125.2 U12.1
NetC67_2: C67.2 C69.2 C71.1 D3.1 R122.2 U11.3
NetC68_2: C68.2 C70.2 C72.1 D4.1 R124.2 U12.3
NetC73_1: C73.1 R126.2
NetC74_1: C74.1 R127.2
NetC75_2: C75.2 J6.1 L4.2
NetC76_1: C76.1 J6.2 L5.2
NetC77_2: C77.2 J7.1 L6.2
NetC78_1: C78.1 J7.2 L7.2
NetC89_2: C89.2 FB10.2 R144.2 U16.1
NetC95_2: C95.2 U18.2
NetC96_2: C96.2 U18.27
NetD3_2: D3.2 L2.2 R118.2 U11.2
NetD4_2: D4.2 L3.2 R119.2 U12.2
NetJ1_A5: J1.A5 R20.2
NetJ1_B5: J1.B5 R21.2
NetJ5_2: J5.2 R112.2 R115.1
NetJ5_3: J5.3 R113.2
NetJ5_5: J5.5 R116.2
NetJ5_6: J5.6 R114.2
NetL1_1: L1.1 U6.8
NetLED1_1: LED1.1 R10.1
NetLED2_1: LED2.1 LED3.1 R23.1
NetLED2_2: LED2.2 U6.3
NetLED3_2: LED3.2 U6.4
NetP10_1: P10.1 U2.5
NetP13_1: P13.1 R94.2
NetP14_1: P14.1 R95.2
NetP15_1: P15.1 R97.2
NetP16_1: P16.1 R98.2
NetP17_1: P17.1 R99.2
NetP18_1: P18.1 R100.2
NetP19_1: P19.1 R101.2
NetP20_1: P20.1 R102.2
NetP21_1: P21.1 R103.2
NetP22_1: P22.1 R104.2
NetP23_1: P23.1 R105.2
NetP24_1: P24.1 R106.2
NetP25_1: P25.1 R96.2 R109.1
NetP26_1: P26.1 U18.21
NetP27_1: P27.1 U18.22
NetQ1_4: Q1.4 R2.2
NetQ2_4: Q2.4 R5.2 R7.1
NetQ2_5: Q2.5 Q2.6 Q2.7 Q2.8 SB1.1
NetQ3_1: Q3.1 R29.1
NetQ3_3: Q3.3 R32.1 R33.1 R34.1
NetQ4_1: Q4.1 R39.1
NetQ4_3: Q4.3 R41.1
NetQ5_1: Q5.1 R40.1
NetQ5_3: Q5.3 R42.1
NetR4_1: R4.1 U1.1
NetR5_1: R5.1 U2.4
NetR8_1: R8.1 R9.2 U3.4
NetR17_1: R17.1 U4.4
NetR18_1: R18.1 R19.2 U5.4
NetR24_2: R24.2 U6.2
NetR25_1: R25.1 U6.6
NetR30_2: R30.2 U7.3
NetR36_2: R36.2 R37.1 U7.2
NetR66_1: R66.1 U9.17
NetR67_2: R67.2 U9.16
NetR68_1: R68.1 U10.3
NetR69_1: R69.1 U10.7
NetR72_2: R72.2 R75.1 U10.6
NetR73_1: R73.1 R76.1 U10.1
NetR74_2: R74.2 R85.2 U9.29
NetR75_2: R75.2 U9.1
NetR76_2: R76.2 U9.64
NetR77_1: R77.1 U10.2
NetR77_2: R77.2 U9.2
NetR78_1: R78.1 U10.5
NetR78_2: R78.2 U9.3
NetR79_2: R79.2 U9.15
NetR80_2: R80.2 U9.52
NetR81_2: R81.2 U9.53
NetR82_2: R82.2 U9.55
NetR83_2: R83.2 U9.56
NetR84_2: R84.2 U9.57
NetR86_2: R86.2 U9.30
NetR87_2: R87.2 U9.31
NetR88_2: R88.2 U9.32
NetR89_1: R89.1 U9.60
NetR90_1: R90.1 U9.61
NetR91_1: R91.1 U9.62
NetR92_1: R92.1 U9.63
NetR93_1: R93.1 U9.18
NetR94_1: R94.1 U9.33
NetR95_1: R95.1 U9.34
NetR96_1: R96.1 U9.36
NetR97_1: R97.1 U9.37
NetR98_1: R98.1 U9.38
NetR99_1: R99.1 U9.39
NetR100_1: R100.1 U9.40
NetR101_1: R101.1 U9.41
NetR102_1: R102.1 U9.43
NetR103_1: R103.1 U9.44
NetR104_1: R104.1 U9.45
NetR105_1: R105.1 U9.47
NetR106_1: R106.1 U9.48
NetR107_1: R107.1 U9.50
NetR108_1: R108.1 U9.49
NetR135_1: R135.1 U13.2
NetR136_2: R136.2 U13.3
NetR137_1: R137.1 U14.2
NetR138_2: R138.2 U14.3
NetR139_1: R139.1 U15.2
NetR140_2: R140.2 U15.3
NetR141_1: R141.1 U13.4
NetR142_1: R142.1 U14.4
NetR143_1: R143.1 U15.4
NetR146_1: R146.1 R147.2 U16.4
NetR148_2: R148.2 U18.28
ON-OFF-BUT: J9.8 U2.1
PA_INL+: R110.1 U11.6
PA_INL-: R111.1 U11.7
PA_INR+: R126.1 U12.6
PA_INR-: R127.1 U12.7
PA_OUTL+: L5.1 U11.5
PA_OUTL-: L4.1 U11.4
PA_OUTR+: L7.1 U12.5
PA_OUTR-: L6.1 U12.4
ROW1: J9.1 U17.10
ROW2: J9.2 U17.11
ROW3: J9.3 U17.12
ROW4: J9.4 U17.14
RXD0: J3.4 U8.34
TXD0: J3.3 U8.35
VBAT: C20.2 J2.2 L1.2 Q1.5 Q1.6 Q1.7 Q1.8 R25.2
VBUS: C19.2 D1.2 D2.1 J1.A9 J1.B9 R1.2 R2.1 R23.2 U6.1 U6.5
VCC: C8.2 C10.1 FB2.1 FB3.1 J9.9 P1.1 R10.2 SB1.2
VCC-AUDIO: C57.1 C58.1 C59.2 C60.2 C61.2 C62.2 FB2.2 L2.1 L3.1
VCC-LDO: C1.2 FB1.1 FB3.2 FB4.1 FB5.1 FB10.1 R4.2 U1.2
VDD-3V3: C6.2 C90.2 J3.1 P6.1 R26.2 R27.2 R35.1 R115.2 R145.2 SW1.1 SW1.2 U1.4 U17.5
VIN: C3.2 C4.2 C5.2 Q1.1 Q1.2 Q1.3 Q2.1 Q2.2 Q2.3 R3.2 R7.2 U2.6
VUSB: D2.2 P2.1 R3.1
ZL38063-1V2: C14.2 C16.2 FB9.1 P3.1 R17.2 U4.5
ZL38063-3V3: C15.2 C17.2 C40.1 C83.2 C84.2 C85.2 C86.2 C87.2 C88.2 FB6.1 FB7.1 FB8.1 P4.1 R18.2 R66.2 R68.2 R69.2 R70.2 R71.2 R73.2 R109.2 R137.2 U5.5 U10.8 U13.1 U14.1 U15.1
ZL38063_1V2_EN: R15.1 R67.1 U4.3
ZL38063_DAC1_N: C48.1 C54.2 C56.2 R117.1
ZL38063_DAC1_P: C47.1 C52.2 C95.1
ZL38063_DAC1_PA_P: C53.2 C55.2 J5.7 R117.2
ZL38063_DAC2_N: C50.1 C74.2 C80.2 R128.1
ZL38063_DAC2_P: C49.1 C51.2
ZL38063_DAC2_PA_P: C73.2 C79.2 J5.4 R128.2
ZL38063_DMIC_CLK: R93.2 R136.1 R138.1 R140.1
ZL38063_DMIC_IN1: R141.2 R142.2 U9.19
ZL38063_DMIC_IN2: R143.2 U9.20
ZL38063_HINT: P12.1 R70.1 R84.1
ZL38063_LDO_EN: R16.1 R33.2 U5.3
ZL38063_UART_RX: J4.1 R107.2
ZL38063_UART_TX: J4.2 R108.2
pads on no net: J5.MH U8.5 U8.17 U8.18 U8.19 U8.20 U8.21 U8.22 U8.27 U8.28 U8.32 U9.25 U9.26 U9.27 U17.3 U17.8 U17.13 U17.18 U18.1

## Silkscreen, mask and mechanical layers (free items; w line width, h text height)
Board Outline:
  the board outline again, w0.254

## Text inside footprints (layer, text, board x,y; h text height)
J1: Mechanical 13 "PCB Edge" at 78.584,2.54 h0.8
J2: Top Overlay "PCB Edge" at 63.135,1.846 h1.2
J5: Top Overlay "Board Edge" at 386.935,4.75 h1.02 r90
J6: Top Overlay "PCB Edge" at 447.675,7.058 h1.2
J7: Top Overlay "PCB Edge" at 318.516,7.058 h1.2
J9: Top Overlay "1" at 115.748,22.301 h0.5 r90
J10: Top Overlay "1" at 229.159,22.301 h0.5 r90
J11: Top Overlay "1" at 142.799,22.301 h0.5 r90